# Altium PCB GTV4.0-V16_Lite.PcbDoc (part 6 of 7)
Units mil, origin at the board's own origin, x right, y up, seen from the top; angles counter-clockwise.
Board outline 5582.68 x 4389.76 mil, 4 copper layers (Top Layer, Layer 1, Layer 2, Bottom Layer), stack 62.631 mil thick; 269 components, 191 nets, 849 pads, 375 vias.
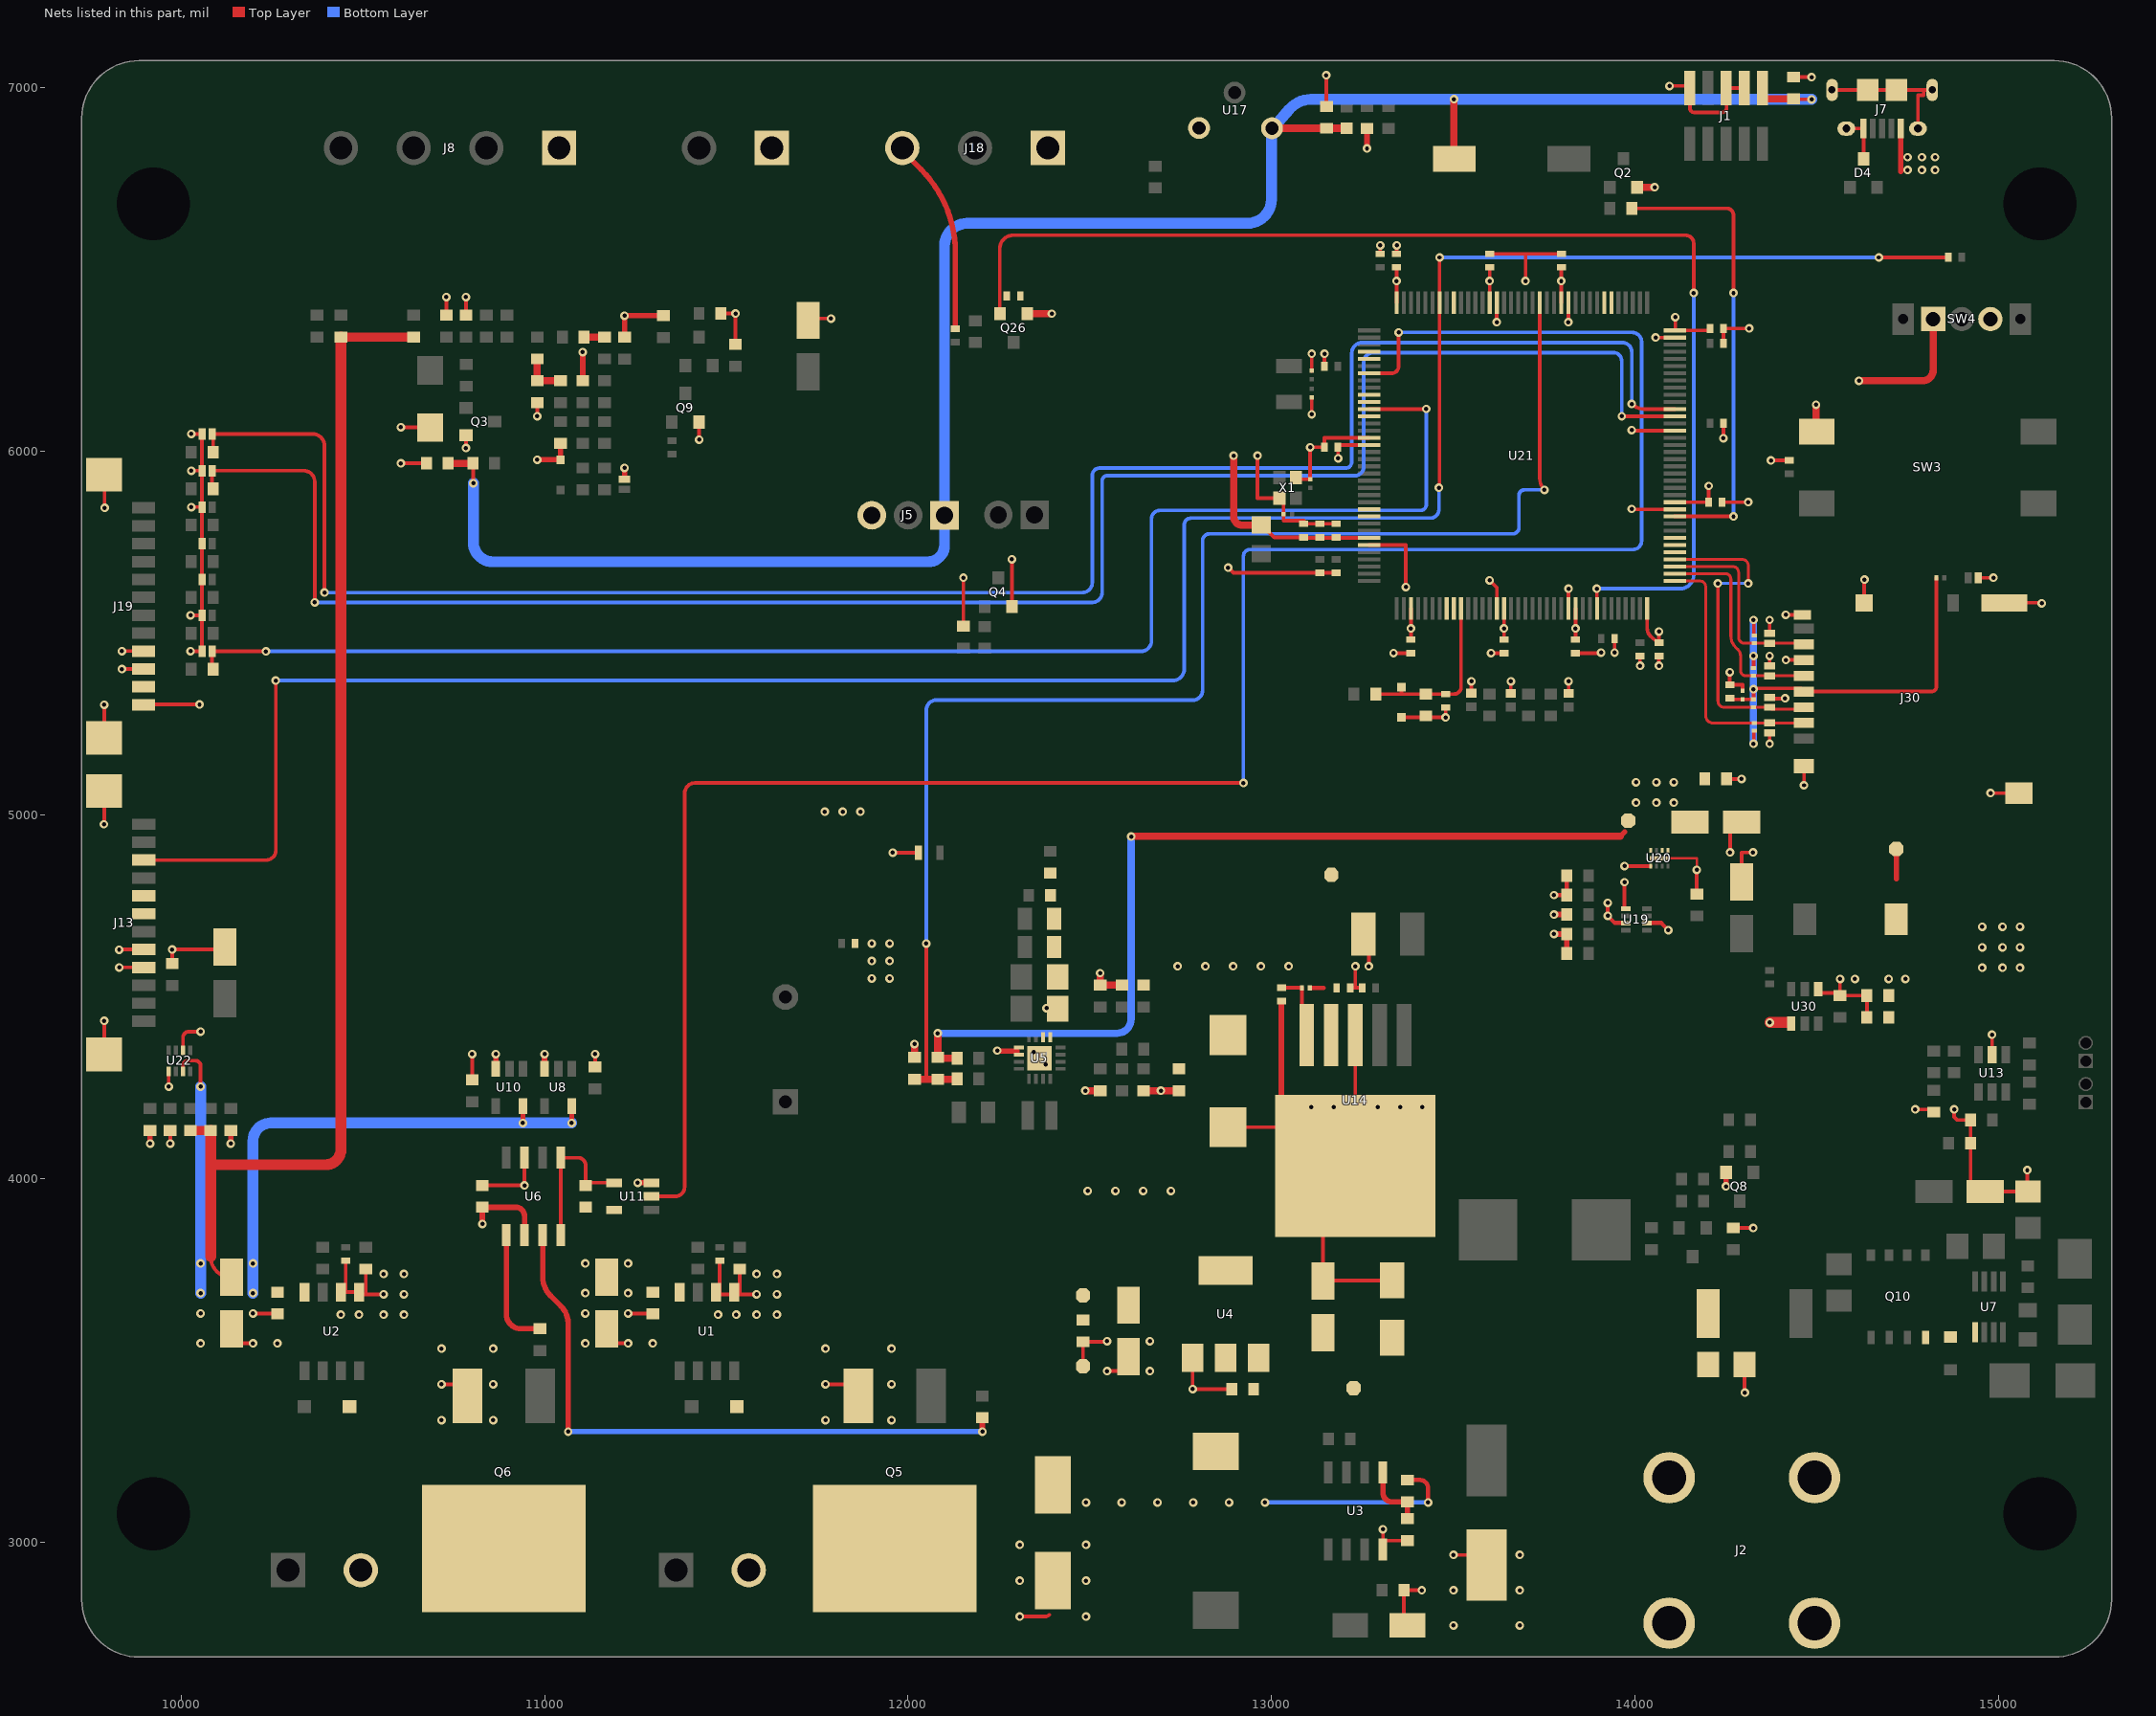
[diagram p4: the nets of this part, all layers, seen from the top]

## Via types
v1: diameter 23.62, hole 11.81, Top Layer to Bottom Layer, tented both sides, 375 vias

## Nets (pads, with @x,y where several pads share a name; then routed paths per layer and width w, separated by ;. In a path a pad name is that pad's centre, name@x,y a point inside that pad or via, vN(x,y) a via of type N, cw(c..) or ccw(c..) an arc to the next point about the centre after c; other vN are vias at no path point) (continued)
5V-LED: (continued)
  other v1: 14697,4550 14742.46,4550 11771,5010 11820,5010 11869,5010
_ADC: C36.2 D5.2 R12.1 R13.2 U21.46 | length 476.9
  Top Layer w10: R12.1@13286,5333.3 13357,5333.3 ; D5.2@13357,5351.84 13357,5333.3 ; R13.2@13420.68,5333.3 13357,5333.3 ; R13.2@13424,5333.3 C36.2@13478.37,5333.3 13501.43,5333.3 ccw(c13501.43,5352.55) 13520.68,5352.55 U21.46@13520.68,5568.53
AC_HEATER_O: U21.114
AC_SOLINOIDE_O: U21.115
ACV_PRESENT: U21.136
ADDR-LED: Q26.2 R73.2 U21.65 | length 3376.1
  Top Layer w10: Q26.2@12252.6,6379.37 12251.82,6392.48 12251.82,6557.71 cw(c12289.23,6557.71) 12289.23,6595.12 14138.17,6595.12 cw(c14138.17,6572.79) 14160.5,6572.79 v1(14160.5,6436) ; v1(13894,5623) 13894.35,5622.65 13894.35,5568.87 U21.65@13894.69,5568.53
  Bottom Layer w10: v1(13894,5623) 14123,5623 ccw(c14123,5660.5) 14160.5,5660.5 v1(14160.5,6436)
ADJ: R62.1 R63.2 U14.5 | length 192
  Top Layer w10: R63.2@13026.52,4525.6 R62.1@13083.09,4525.6 13083.09,4408.66 U14.5@13096.14,4395.6
BACKUP: C123.2 R162.1 R163.2 U21.124 | length 3900.8
  Top Layer w10: 12049.95,4274.01 v1(12049.95,4647) ; R163.2@12133.58,4274.01 R163.2@12134.49,4274.93 ; U21.124@13737.21,6409.47 13737.21,5925.87 ccw(c13780.87,5925.87) 13747.39,5897.85 ccw(c13780.87,5925.87) v1(13750,5895)
  Top Layer w20: C123.2@12027.49,4274.01 12049.95,4274.01 R163.2@12133.58,4274.01
  Bottom Layer w10: v1(12049.95,4647) 12049.95,5288.88 cw(c12077.79,5288.88) 12077.79,5316.72 12783.09,5316.72 ccw(c12783.09,5343.53) 12809.9,5343.53 12809.91,5754.99 cw(c12828.89,5754.99) 12828.89,5773.98 13662.66,5773.98 ccw(c13662.66,5791.31) 13680,5791.31 13680,5880 cw(c13695,5880) 13695,5895 v1(13750,5895)
BAT: C2.2 J2.2 R149.2
BOOT0: J13.3 R16.1 U21.138 | length 6575.7
  Top Layer w10: J13.3@9897.62,4876.81 10234.42,4876.81 ccw(c10234.42,4903.26) 10260.87,4903.26 v1(10260.87,5370.34) ; v1(13460,5900.42) 13461.11,5901.53 13461.11,6408.96 U21.138@13461.62,6409.47 v1@13461.62,6534 ; v1(14670,6534) R16.1@14860.77,6534
  Bottom Layer w10: v1(10260.87,5370.34) 12727.62,5370.34 ccw(c12727.62,5402.06) 12759.34,5402.06 12759.34,5798.11 cw(c12778.52,5798.11) 12778.52,5817.29 13436.33,5817.29 ccw(c13436.33,5840.96) 13460,5840.96 v1(13460,5900.42) ; v1(13462,6534) v1(14670,6534)
BUZZER: R6.1 U21.82 | length 1280.6
  Top Layer w10: R6.1@13990.18,6669 14251.23,6669 cw(c14251.23,6650.23) 14270,6650.23 v1(14270,6436) ; U21.82@14108.47,5821.68 v1(14270,5821.68)
  Bottom Layer w10: v1(14270,5821.68) 14270,6307.1 v1(14270,6436)
CE: U21.13
CII: R1.1 R3.1 U3.5 | length 184.4
  Top Layer w15: U3.5@13306,3193.14 13306,3136.64 ccw(c13330.8,3136.64) 13330.8,3111.84 R1.1@13373.48,3111.84 R3.1@13373.48,3065.55
CLK: D22.2 J30.5 R158.1 U21.74 | length 605
  Top Layer w8: U21.74@14108.47,5664.2 14247.97,5664.2 cw(c14247.97,5649.39) 14262.77,5649.39 14262.77,5493.59 ccw(c14308.26,5493.59) 14276.08,5461.44 ; 14276.09,5461.42 14282.3,5455.22 cw(c14265.12,5438.04) 14289.42,5438.04 14289.42,5397.93 ccw(c14303.72,5397.93) 14303.72,5383.63 R158.1@14325.11,5383.63 D22.2@14369.34,5383.63 J30.5@14464.03,5383.63
CMD: D21.2 J30.3 R157.1 U21.76 | length 918.4
  Top Layer w8: U21.76@14108.47,5703.57 14293.79,5703.57 cw(c14293.79,5686.84) 14310.51,5686.84 v1(14310.51,5637.51) ; v1(14227.21,5637.51) 14227.21,5313.98 ccw(c14244.17,5313.98) 14244.17,5297.02 R157.1@14325.11,5297.02 D21.2@14369.34,5297.02 14374.34,5292.01 14459.03,5292.01 J30.3@14464.03,5297.02
  Bottom Layer w8: v1(14227.21,5637.51) v1(14310.51,5637.51)
DAC_SCL: U21.11
DAC_SDA: U21.10
DAT0: D23.2 J30.7 R159.1 U21.75 | length 554.1
  Top Layer w8: U21.75@14108.47,5683.88 14268.4,5683.88 cw(c14268.4,5668.35) 14283.92,5668.35 14283.92,5489.86 ccw(c14300.98,5489.86) 14300.98,5472.81 D23.2@14369.34,5472.81 14461.47,5472.81 cw(c14461.47,5470.25) J30.7@14464.03,5470.25
DAT3: D20.2 J30.2 R156.1 U21.73 | length 730.8
  Top Layer w8: U21.73@14108.47,5644.51 14176.88,5644.51 cw(c14176.88,5627.67) 14193.73,5627.67 14193.73,5273.16 ccw(c14213.17,5273.16) 14213.17,5253.71 R156.1@14326.8,5253.71 D20.2@14369.34,5253.71 J30.2@14464.03,5253.71
DR_485_1: U21.26
DR_485_2: U21.27
DR_485_3: U21.44
DR_485_4: U21.45
DRV_OUTA1: R24.1 U6.7 | length 1740.8
  Top Layer w15: U6.7@10995,3845.7 10995,3730.8 ccw(c11069.36,3730.8) 11016.78,3678.22 11045.91,3649.09 ; 11045.93,3649.07 cw(c10999.82,3603) 11065,3603 v1(11065,3305) ; v1(12204,3305) R24.1@12204,3343.08
  Bottom Layer w15: v1(11065,3305) v1(12204,3305)
DRV_OUTB1: R25.1 U6.5 | length 333.1
  Top Layer w15: U6.5@10895,3845.7 10895,3628 ccw(c10935,3628) 10935,3588 R25.1@10987.57,3588
ENA: U11.2 U21.7 | length 5899.8
  Top Layer w10: U11.2@11294.18,3952 11359.75,3952 ccw(c11359.75,3977.59) 11385.34,3977.59 11385.34,5059.88 cw(c11414.46,5059.88) 11414.46,5089 v1(12922,5089) ; U21.7@13267.53,6215.38 13329.34,6215.38 ccw(c13329.34,6235.06) 13349.02,6235.06 v1(13349.02,6327.98)
  Bottom Layer w10: v1(12922,5089) 12922,5712.15 cw(c12940.72,5712.15) 12940.72,5730.87 13993.51,5730.87 ccw(c13993.51,5754.46) 14017.11,5754.46 14017.11,6301.99 ccw(c13991.13,6301.99) 13991.13,6327.98 v1(13349.02,6327.98)
ENA#: R48.2 U6.1 U6.8 U11.4 | length 429.6
  Top Layer w10: U6.8@11045,3845.7 U6.1@11045,4058.3 11091.7,4058.3 cw(c11091.7,4037) 11113,4037 R48.2@11113,3982 11120.4,3989.4 U11.4@11191.82,3989.4
ESP_RXD2: J13.6
ESP_TXD2: J13.5
FILL_CNTRL: U21.5
FLOW_MCU1: U21.79
FLOW_MCU2: U21.78
FLOW_MCU3: U21.77
FLUSH_CNTRL: U21.4
GATE: D71.1 Q10.4 U7.1
GND: C1.2 C2.1 C3.2 C4.2 C5.2 C6.2 C7.2 C8.1 C9.2 C10.1 C11.2 C12.2 C13.2 C14.2 C16.2 C17.2 C18.2 C19.2 C20.1 C21.2 C22.2 C23.2 C24.2 C25.1 C26.2 C28.1 C29.2 C30.2 C31.2 C32.2 C33.2 C34.1 C35.1 C36.1 C37.2 C38.2 C53.2 C65.2 C66.1 C67.1 C68.2 C69.1 C73.1 C76.2 C77.1 C88.1 C89.2 C90.1 C91.2 C93.2 C95.2 C107.1 C108.1 C109.2 C110.2 C111.2 C112.2 C113.2 C114.2 C122.1 C123.1 C128.1 C129.1 C131.1 C132.1 C133.1 C134.1 D1.2 D2.2 D3.1 D4.3 D5.1 D8.2 D12.1 D17.1 D18.1 D19.1 D20.1 D21.1 D22.1 D23.1 D24.1 D25.1 D26.1 D27.1 D32.1 J1.3 J1.5 J1.9 J2.1 J5.3 J6.1 J7.5 J7.MP1 J7.MP2 J7.S1 J7.S2 J7.S3 J7.S4 J8.1 J13.8 J13.9 J13.MP1 J13.MP2 J18.1 J19.9 J19.10 J19.MP1 J19.MP2 J30.6 J30.S1 J30.S2 J30.S3 J30.S4 J30.SW-B LED11.2 NT1.2 P10.1 Q2.2 Q3.2 Q4.2 Q5.2 Q6.2 Q8.2 Q9.2 R3.2 R4.2 R7.2 R10.2 R13.1 R19.1 R21.1 R28.2 R34.1 R43.2 R44.1 R46.1 R47.1 R63.1 R64.2 R65.1 R126.1 R128.1 R131.1 R165.1 R166.1 R167.1 SW3.1 SW4.3 U1.5 U1.6 U2.5 U2.6 U3.4 U4.1 U5.17 U6.3 U8.3 U10.3 U11.3 U13.2 U14.3 U14.6 U17.3 U19.1 U20.5 U20.9 U21.16 U21.31 U21.51 U21.61 U21.83 U21.94 U21.107 U21.120 U21.130 U22.1 U30.4 X1.2 X1.4 | length 13382.2
  Top Layer w7: U20.9@14065.68,4881.96 14169,4881.96 v1(14169,4850.07)
  Top Layer w10: v1(9788.23,4975.24) ccw(c9786.46,4977) 9788.96,4977 J13.MP1@9788.96,5066.77 ; J19.MP2@9788.23,5212.37 9788.96,5213.1 v1(9788.96,5303.9) ; J19.MP1@9788.23,5936.77 9790,5935 v1(9790,5845.24) ; J13.MP2@9788.96,4342.37 v1(9789,4435) v1(9789,4435) ; v1(9830,4630) cw(c9831.81,4628.19) 9831.81,4630.75 J13.8@9897.62,4630.75 ; v1(9830.44,4581.67) 9830.58,4581.54 J13.9@9897.62,4581.54 ; v1(9837.44,5401.96) 9837.8,5402.32 J19.10@9896.9,5402.32 ; v1(9837.44,5451.53) J19.9@9896.89,5451.53 ; v1(9966.33,4254) U22.1@9966.33,4296.11 ; v1(9970.5,4097) R128.1@9970.5,4133.19 ; C69.1@9976,4592 9976,4630.43 v1(9975.68,4630.75) 10104.14,4630.75 ccw(c10104.14,4654.59) C76.2@10121,4637.73 ; v1(10026.6,5451.53) 10026.96,5451.17 D32.1@10058,5451.17 D27.1@10058,5549.6 ; v1(10026.6,5549.96) 10026.96,5549.6 D27.1@10058,5549.6 ; v1(10028.56,5847.57) D19.1@10058,5847.57 ; v1(10028.56,5947.57) D18.1@10058,5947.57 ; v1(10028.56,6048.57) D17.1@10058,6048.57 D18.1@10058,5947.57 ; C16.2@10154,3546 cw(c10158.83,3541.17) 10158.83,3548 v1(10198,3548) ; v1(10198,3630) 10262.02,3630 cw(c10262.02,3625) C17.2@10265.56,3628.54 ; C19.2@10453.34,3775 10453.34,3688.54 U2.5@10489.56,3688.54 10495.4,3682.69 10508.56,3682.69 ; R10.2@10508.56,3752 10508.56,3682.69 ; v1(10557.28,3682.69) 10508.56,3682.69 ; v1(10605,5968) C28.1@10675,5968 ; v1(10605,6067) 10684.26,6067 D8.2@10685,6066.26 ; v1(10716.57,3435) 10767.31,3435 ccw(c10767.31,3451.05) Q6.2@10778.66,3439.7 ; C37.2@10730,6375 v1(10730,6425) ; v1(10783.95,6010) Q3.2@10783.95,6045.2 ; R43.2@10783.95,6375 v1(10783.95,6425) ; R47.1@10801,4272.18 v1(10801,4343) ; C38.2@10829,3982 v1(10945,3982) U6.3@10945,4058.3 ; v1(10980,6097.6) R21.1@10980,6135 ; R46.1@11139,4308 v1(11139,4343) ; C4.2@11178.58,3548 v1(11230,3548) ; v1(11230,3630) 11294.02,3630 cw(c11294.02,3625) C6.2@11297.56,3628.54 ; v1(11425.03,6032.87) Q9.2@11425,6081.26 ; U1.6@11478.88,3683.33 ccw(c11472.43,3689.78) 11479.28,3683.74 ccw(c11472.43,3689.78) 11481.56,3689.78 C11.2@11481.56,3775 ; R19.1@11485,6380 v1(11525,6380) C25.1@11525,6295 ; 11485.67,3682.69 U1.5@11534.47,3682.69 ; R7.2@11536.56,3752 11536.56,3687.73 cw(c11529.44,3687.73) U1.5@11534.47,3682.69 ; v1(11583.28,3682.69) U1.5@11534.47,3682.69 ; C24.2@11725,6360.87 cw(c11730.13,6360.87) 11730.13,6366 v1(11788,6366) ; v1(11772.57,3435) 11840.34,3435 ccw(c11840.34,3448.66) Q5.2@11850,3439 ; v1(11957.29,4897) LED11.2@12028,4897 ; R44.1@12152,5520 v1(12152,5653) ; v1(12285,5704) 12285.4,5704 Q4.2@12285.4,5574.26 ; v1(12307,2796.68) 12377.17,2796.68 ccw(c12377.17,2812.87) 12388.61,2801.42 ; P10.1@12481,3485 C26.2@12481,3552 12543.47,3552 ccw(c12543.47,3557) v1(12547,3553.46) ; v1(12547,3471.46) 12600.97,3471.46 C23.2@12601.27,3471.76 ; U4.1@12782.45,3508 v1(12782.45,3422) C22.2@12890,3422 ; C89.2@12880,4142.06 13082.08,4142.06 cw(c13082.08,4042.06) 13112.26,4137.4 cw(c13082.08,4042.06) 13152.79,4112.77 U14.6@13230,4035.56 U14.3@13230,4395.6 ; v1(12880,5681) 12894.43,5666.57 C7.2@13133,5666.57 C113.2@13177,5666.57 ; v1(12961,5989) 12961,5871.91 X1.4@13021.27,5871.91 13032.47,5871.91 C34.1@13032.47,5828.32 13032.47,5810.5 13088,5810.5 C114.2@13088,5801.5 C112.2@13133,5801.5 C29.2@13177,5801.5 ; X1.2@13066.54,5929 13066.54,5924.04 C35.1@13105.5,5924.04 v1(13105.5,6012.07) 13105.73,6012.3 13144.77,6012.3 C12.2@13145,6012.53 13145,6038.21 U21.16@13267.53,6038.21 ; v1(13110,6102.78) C134.1@13110,6149.39 ; C133.1@13110,6222.31 v1(13110,6268.92) ; v1(13150,7035) 13150,6949.9 C13.2@13150.5,6949.4 ; U14.6@13173.2,3993.5 13170.29,3990.59 ccw(c13241,3919.88) 13141,3919.88 C21.2@13141,3718.77 cw(c13145.75,3714.02) 13145.75,3720.74 D2.2@13331,3720.74 ; C88.1@13215.5,4525.6 13232,4525.6 ; v1(13230,4585) 13230,4530.43 ccw(c13236.83,4530.43) 13232,4525.6 ; C90.1@13248.5,4525.6 13232,4525.6 ; C91.2@13252.65,4673 cw(c13218,4638.35) 13267,4638.35 v1(13267,4585) ; U21.31@13267.53,5742.94 13368.71,5742.94 v1(13368.71,5627.61) ; U3.4@13306,2980.55 U3.4@13306,3005.55 ; v1(13306,3036.73) U3.4@13306,3005.55 ; v1(13335,5446) C30.2@13382.88,5446 ; C111.2@13343.51,6544 13343.51,6567.37 v1(13343.83,6567.37) ; D5.1@13357,5269.17 13419.87,5269.17 R13.1@13424,5273.3 13428.13,5269.17 v1(13478.37,5269.17) C36.1@13478.37,5296.3 ; D1.2@13373.48,2772 13363.48,2772 C20.1@13363.48,2869 v1(13412.69,2869) ; R3.2@13373.48,3005.55 U3.4@13306,3005.55 ; v1(13500,2966) 13591,2966 C9.2@13591,2938.3 ; v1(13599.42,5646) 13619.1,5626.32 U21.51@13619.1,5568.53 ; C110.2@13600,6544 13698.32,6544 ; v1(13603,5446) C31.2@13638.79,5446 ; v1(13619,6356) 13619,6409.47 U21.130@13619.1,6409.47 ; v1(13697.84,6468.99) 13698.32,6468.99 13698.32,6544 ; C109.2@13796.64,6544 13698.32,6544 ; v1(13815.85,6356) U21.120@13815.85,6409.47 ; U21.61@13815.95,5568.53 13816.23,5568.8 13816.23,5622.73 v1(13816.5,5623) ; C32.2@13835.64,5446 13904.98,5446 ccw(c13904.98,5447.04) v1(13906.02,5447.04) ; v1(13970.36,4816) 13970.36,4744.28 13971.66,4742.98 U19.1@13974.32,4742.98 ; v1(13970.36,4860.4) U20.5@14041,4860.4 ; v1(13990.3,6059) ccw(c13991.4,6059) 13991.4,6057.9 U21.94@14108.47,6057.9 ; v1@13991.4,5841.36 U21.83@14108.47,5841.36 ; C131.1@14012.73,5438.04 14012.8,5438.04 v1(14012.8,5411) ; v1(14056,6314) 14056,6313.8 U21.107@14108.47,6313.8 ; v1(14065,5411) C33.2@14065,5438.04 ; v1(14094,7005.64) 14144.36,7005.64 J1.9@14150,7000 14150,6944.64 ccw(c14161.64,6944.64) 14161.64,6933 14239,6933 ccw(c14239,6945) 14251,6945 14251,6999 ccw(c14250,6999) J1.5@14250,7000 J1.3@14300,7000 ; C67.1@14169,4783.3 v1(14169,4850.07) ; C93.2@14238.5,5861.05 v1(14310.51,5861.05) ; C132.1@14242.5,6298.12 C95.2@14242.5,6338 14243,6338.5 14312.5,6338.5 v1(14313,6339) ; C66.1@14251.13,5100 v1(14292,5100) ; C65.2@14259.1,4980.85 14260.5,4980.85 v1(14260.5,4897.86) ; v1(14259.84,5393.47) C107.1@14259.84,5358.8 14295,5358.8 C108.1@14295,5342.29 ; R34.1@14269.4,3865.15 v1(14324.3,3865.15) ; C68.2@14292,4816.3 14292,4897.86 v1(14323.5,4897.86) ; C2.1@14300,3490 14300,3414.41 ccw(c14303.41,3414.41) v1(14301,3412) ; v1(14369.34,5196.62) D20.1@14369.34,5226.15 ; D21.1@14369.34,5324.58 14372.96,5320.95 14410.89,5320.95 v1(14411.8,5321.86) ; D22.1@14369.34,5411.19 v1(14369.34,5438.04) ; D23.1@14369.34,5500.36 v1(14369.34,5537.18) ; v1(14373,5976) 14373,5975.93 C73.1@14423,5975.93 ; v1(14414,5551) J30.SW-B@14460.09,5550.96 ; v1(14414.11,5426.75) 14414.11,5426.94 J30.6@14464.03,5426.94 ; C14.2@14435,7030 v1(14485,7030) ; v1(14464.03,5082.5) J30.S1@14464.03,5135.6 ; SW3.1@14497,6056.85 ccw(c14499,6056.85) SW3.1@14499,6054.85 ; U30.4@14503.4,4521.49 14503.4,4511.28 C77.1@14553.51,4511.28 ; J7.S3@14541.02,6994.73 J7.MP2@14639.45,6994.73 J7.MP1@14718.19,6994.73 14792.94,6994.73 ; v1(14563,4550) C77.1@14563,4504.24 C128.1@14636.97,4504.24 C129.1@14636.97,4444.24 ; J7.S2@14580.39,6888.43 J7.5@14627.64,6888.43 D4.3@14627.64,6805.21 ; J30.S2@14629.39,5584.42 14629.39,5648 v1(14630,5648) ; v1(14769.79,4191.08) 14813.61,4191.08 R65.1@14820.92,4183.77 ; J7.S1@14777.24,6888.43 14777.24,6979.96 14792.94,6979.96 14792.94,6994.73 ; J7.S4@14816.61,6994.73 14792.94,6994.73 ; v1(14876.83,4191.08) 14876.83,4170.63 14885.69,4161.77 C53.2@14921.83,4161.77 C3.2@14921.83,4098 14921.83,3965 C1.2@14962.7,3965 R64.2@15078,3965 ; D24.1@14942.56,5653 v1(14985,5653) ; v1(14977,5061) 14977,5060.8 J30.S4@15054.58,5060.8 ; v1(14980.86,4396.39) 14981.14,4396.39 U13.2@14981.14,4341.92 ; J30.S3@15015.21,5584.42 15118,5584.42 v1(15118,5583) ; v1(15078,4024) R64.2@15078,3965 ; R64.2@15079.46,3965 R64.2@15078,3965 ; D27.1@10058,5549.6 D26.1@10058,5648.02 D25.1@10058,5747.57 D19.1@10058,5847.57 ; D19.1@10058,5847.57 D18.1@10058,5947.57
  Top Layer w15: U10.3@10866,4302.36 v1(10866,4343) ; v1(10980,5977.68) D12.1@11044,5977.68 C5.2@11044,6022.6 ; U8.3@11000.06,4302.36 v1(11000.06,4343) ; C8.1@11105,6195 v1(11105,6273.81) ; D3.1@11220,5923.78 v1(11220,5955) ; R28.2@11220,6314.37 v1(11220,6374) C10.1@11326.6,6374 ; v1(11256,3989.4) U11.3@11294.18,3989.4 ; R63.1@13026.52,4488.6 13026.52,4223.14 U14.6@13112.26,4137.4 ; v1(13262,6834) R4.2@13262,6888.93 ; v1(13776,4727) R126.1@13811.25,4727 ; v1(14249.3,3979.29) 14249.4,3979.39 14249.4,4017.72 Q8.2@14249.5,4017.82
  Top Layer w20: C123.1@12017.49,4334.01 v1(12017.49,4371) ; v1(12487.09,4242.49) C122.1@12528.49,4242.49 ; v1(12527.83,4566) 12528.16,4565.67 12528.16,4533.35 R167.1@12528.49,4533.01 R165.1@12587.99,4533.01 ; R166.1@12647.49,4242.49 v1(12695,4242.49) R131.1@12745,4242.49 ; Q2.2@14004.98,6726.87 v1(14053,6726.87) ; SW3.1@14497,6056.85 v1(14497,6129)
  other v1: 13500,2772 13682,2772 12489,2796.68 13500,2869 13682,2869 12307,2895.11 12489,2895.11 13682,2966 12307,2993.54 12489,2993.54 10716.57,3336.57 10858.57,3336.57 11772.57,3336.57 11954.57,3336.57 10858.57,3435 11954.57,3435 12665,3471.46 10716.57,3533.43 10858.57,3533.43 11772.57,3533.43 11954.57,3533.43 10054,3548 10265.56,3548 11112,3548 11297.56,3548 12665,3553.46 10439.56,3626.69 10489.56,3626.69 10557.28,3626.69 10613.28,3626.69 11477.28,3626.69 11527.28,3626.69 11583.28,3626.69 11639.28,3626.69 10054,3630 11112,3630 10613.28,3682.69 11639.28,3682.69 10557.28,3738.69 10613.28,3738.69 11583.28,3738.69 11639.28,3738.69 13109,4197 13170,4197 13292,4197 13353,4197 13414,4197 12378,4315 12344.98,4349.03 14604,4550 11900,4551 11949,4551 11900,4599 11949,4599 11900,4647 11949,4647 13990.3,5842.46
GND_DRV_1: D9.1 J3.2 Q5.3
GND_DRV_2: D10.1 J4.2 Q6.3
GNSS_MCU_RX: D17.2 R97.1 U21.97 | length 5305.5
  Top Layer w10: R97.1@10088.56,5998.23 10088.56,6045.57 ccw(c10085.56,6045.57) D17.2@10085.56,6048.57 10361.75,6048.57 cw(c10361.75,6015.52) 10394.8,6015.52 v1(10394.8,5612.38) ; v1(13990.3,6131.13) ccw(c14024.52,6165.35) 14003.22,6121.89 ccw(c14024.52,6165.35) 14024.52,6116.95 U21.97@14108.47,6116.95
  Bottom Layer w10: v1(10394.8,5612.38) 12478.96,5612.38 ccw(c12478.96,5640) 12506.58,5640 12506.58,5934.53 cw(c12526.7,5934.53) 12526.7,5954.65 13203.05,5954.65 ccw(c13203.05,5971.59) 13220,5971.59 13220,6270.54 cw(c13249.46,6270.54) 13249.46,6300 13963.89,6300 cw(c13963.89,6273.59) 13990.3,6273.59 v1(13990.3,6131.13)
GNSS_MCU_TX: D18.2 R98.1 U21.96 | length 5236.3
  Top Layer w10: R98.1@10088.56,5897.69 cw(c10088.56,5900.69) 10085.56,5900.69 D18.2@10085.56,5947.57 10337.73,5947.57 cw(c10337.73,5917.31) 10367.99,5917.31 v1(10367.99,5585.45) ; v1(13962.73,6097.27) U21.96@14108.47,6097.27
  Bottom Layer w10: v1(10367.99,5585.45) 12506.58,5585.45 ccw(c12506.58,5612.38) 12533.51,5612.38 12533.51,5919.66 cw(c12547.85,5919.66) 12547.85,5934 13228.94,5934 ccw(c13228.94,5957.94) 13252.88,5957.94 13252.88,6245.69 cw(c13279.64,6245.69) 13279.64,6272.45 13939.41,6272.45 cw(c13939.41,6249.12) 13962.73,6249.12 v1(13962.73,6097.27)
GNSS_PWRCTRL: D32.2 R103.1 U21.12 | length 4181.6
  Top Layer w10: R103.1@10085.56,5404.96 D32.2@10085.56,5451.17 10233.94,5451.17 v1(10233.94,5450.77) ; U21.12@13267.53,6116.95 13424.8,6116.95 v1(13424.8,6117.5)
  Bottom Layer w10: v1(10233.94,5450.77) 12640.12,5450.77 ccw(c12640.12,5480) 12669.35,5480 12669.35,5815.66 cw(c12692.04,5815.66) 12692.04,5838.35 13409.43,5838.35 ccw(c13409.43,5853.92) 13425,5853.92 v1@13425,6117.5
GSM_PWR: C88.2 C89.1 C117.2 C118.2 C119.2 C120.2 C121.2 J19.11 J19.12 P9.1 R62.2 R109.2 R129.1 R131.2 R132.2 R133.2 R134.1 R137.2 U5.1 U5.2 U5.13 U5.14 U14.4 U19.6 U22.6 | length 567.4
  Top Layer w10: J19.12@9896.9,5303.9 9897.63,5304.63 v1(10051.1,5304.63) ; U22.6@10005.7,4353.98 10005.7,4388.7 cw(c10022,4388.7) 10022,4405 v1(10054,4405)
  Top Layer w12: R62.2@13108.09,4525.6 13142.99,4525.6 ; v1(13776,4780.5) R133.2@13811.25,4780.5 R129.1@13811.25,4834 ; U19.6@14032.19,4703.61 14071.31,4703.61 v1(14091,4683.93)
  Top Layer w15: v1(9915,4097) R137.2@9915,4133.19 ; v1(10137,4097) R134.1@10137,4133.19 ; v1(12245.24,4352.8) 12246.32,4351.73 12298.13,4351.73 12298.56,4351.29 12298.56,4347.7
  other v1: 12380.65,4469.86 12741.33,4585 12817.67,4585 12894,4585 12970.33,4585 13046.67,4585

## Text inside footprints (layer, text, board x,y; h text height)
J30: Mechanical 13 "PCB Edge" at 15079.32,5281.48 h31.5 r90